# Altium PCB PCB1.PcbDoc
Units mm, origin at the board's own origin, x right, y up, seen from the top; angles counter-clockwise.
Board outline 171.96 x 108.97 mm, 2 copper layers (Top Layer, Bottom Layer); 22 components, 29 nets, 174 pads, 7 vias.
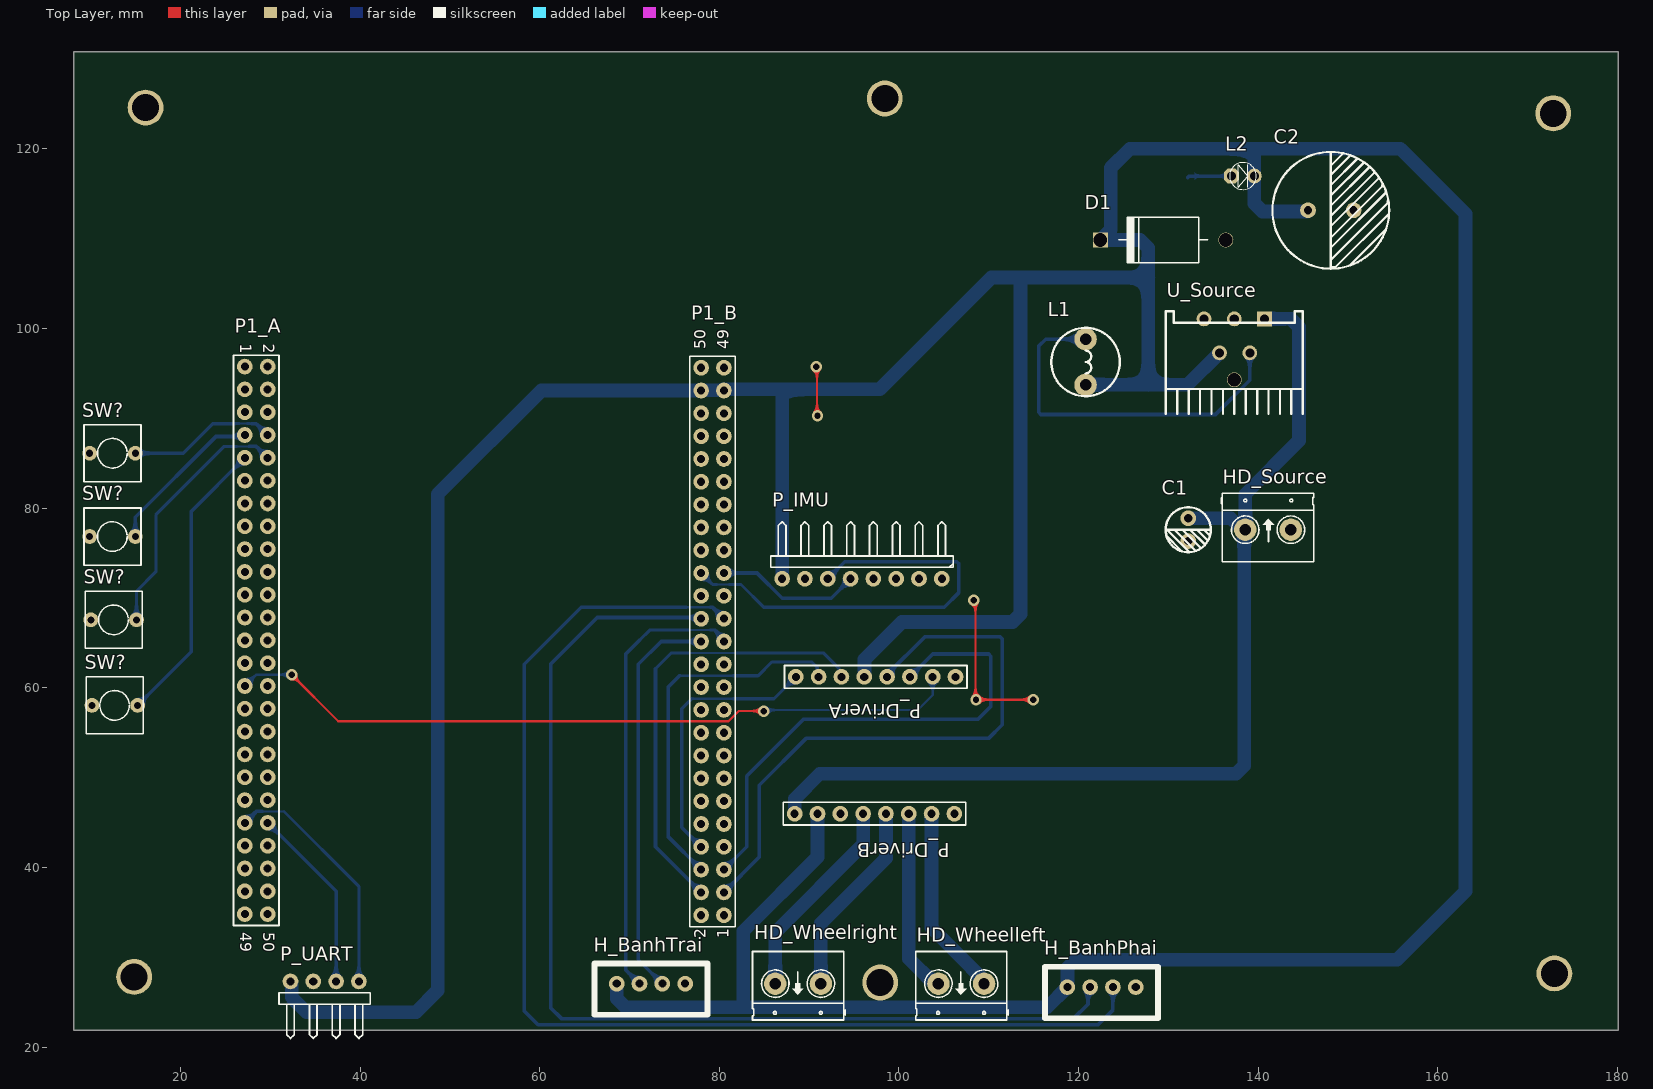
[diagram p0: Top Layer view]
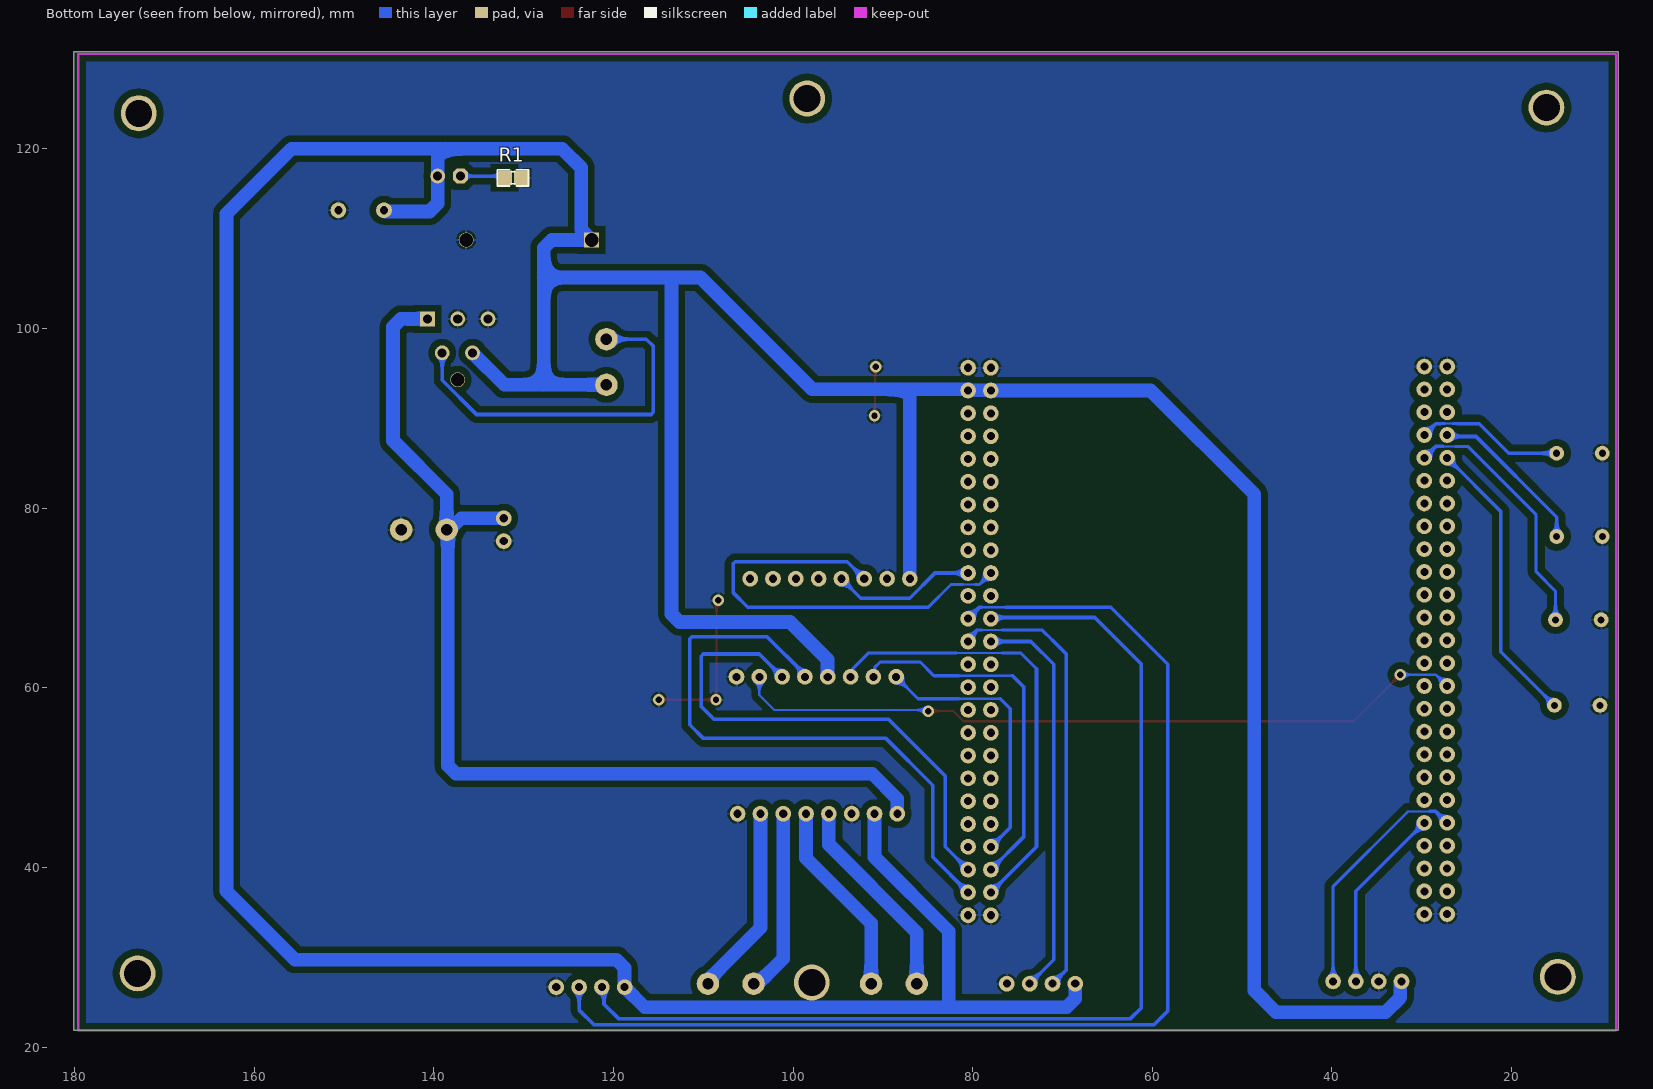
[diagram p1: Bottom Layer view, seen from below]

## Layer stack, top to bottom
Top Solder: solder mask 0.0102, Solder Resist, Dk 3.5
Top Layer: signal copper 0.0356
Dielectric 1: dielectric 0.32, FR-4, Dk 4.8
Bottom Layer: signal copper 0.0356
Bottom Solder: solder mask 0.0102, Solder Resist, Dk 3.5

## Board outline
8.128,21.844 180.086,21.844 180.086,130.81 8.128,130.81

## Design rules (kind name [scope] priority, off if disabled: settings)
Clearance [All] p1: gap=0.3 ignorepadtopadclearanceinfootprint=FALSE except(0.75: Arc-Fill Arc-Poly Arc-Region Track-Fill Track-Poly Track-Region SMDPad-Fill SMDPad-Poly SMDPad-Region THPad-Fill THPad-Poly THPad-Region Via-Fill Via-Poly Via-Region Fill-Fill Fill-Poly Fill-Region Poly-Poly Poly-Region Region-Region)
PolygonConnect [All] p1: connectstyle=Relief reliefconductorwidth=0.254 reliefentries=4 polygonreliefangle="90 Angle" airgapwidth=0.254
RoutingVias [All] p1: holewidth=0.711 width=1.27 viastyle="Through Hole" minholewidth=0.711 minwidth=1.27 maxholewidth=0.711 maxwidth=1.27
SolderMaskExpansion [All] p1: expansion=0.102 istentingtop=FALSE
Width Width_POWER [InNetClass('POWER')] p1: maxlimit=2.54 minlimit=0.254 preferedwidth=1.524 toplayer_maxwidth=0.254 toplayer_prefwidth=0.254 bottomlayer_minwidth=1.219 minimp=50.000000 maximp=50.000000 favimp=50.000000
Width Width_SIGANL [InNetClass('SIGNAL')] p2: maxlimit=0.6 minlimit=0.254 preferedwidth=0.4 toplayer_maxwidth=0.254 toplayer_prefwidth=0.254 bottomlayer_minwidth=0.35 minimp=50.000000 maximp=50.000000 favimp=50.000000
30 further rules are at their usual default settings.

## Classes and differential pairs
net class SIGNAL: NetL1_1 NetL2_1 PA8 PA9 PB4 PB5 PB6 PB7 PB8 PB9 PC0 PC1 PC2 PC3 PC6 PC7 PC8 PC9 PD8 PD9
net class POWER: 5V AO1 AO2 BO1 BO2 VDD VIN
component class Sheet1: C1 C2 D1 H_BanhPhai H_BanhTrai HD_Source HD_Wheelleft HD_Wheelright L1 L2 P1_A P1_B P_DriverA P_DriverB P_IMU P_UART R1 SW? U_Source

## Components (designator, comment, footprint, x,y, rotation, side; value= is the part's Value field where it differs from the comment)
C1 "100uF" "tu hoa 5mm" 132.207,77.597 r270 top
C2 "1000uF" "tu hoa 13mm" 148.082,113.157 r0 top
D1 "1N5822" D5A 122.428,109.855 r0 top value="Diode c?m 1N5408"
H_BanhPhai "Banh phai" XH2.54M-4 126.365,26.67 r180 top
H_BanhTrai "Banh trai" XH2.54M-4 76.2,27.051 r180 top
HD_Source "Header 2" HED2 138.557,77.597 r0 top
HD_Wheelleft "Header 2" HED2 109.474,27.051 r180 top
HD_Wheelright "Header 2" HED2 91.313,27.051 r180 top
L1 "100uH 3A" "CUON CAM 100uH3A" 120.777,96.266 r270 top
L2 "LED 3mm" LED-3MM-RED 137.033,116.967 r0 top
P1_A "Header 25X2" HDR2X25 27.178,95.758 r270 top
P1_B "Header 25X2" HDR2X25 80.518,34.671 r90 top
P_DriverA "Header 8" HDR1X8 106.299,61.214 r180 top
P_DriverB "Header 8" HDR1X8 88.392,45.974 r0 top
P_IMU "IMU" HDR1X8H 104.775,72.136 r180 top
P_UART "UART" HDR1X4H 32.258,27.305 r0 top
R1 "10R" "tro smd 0805" 131.191,116.84 r180 bottom
SW? "SW" SW2 10.16,58.039 r0 top value="SW chip 2 pin"
SW? "SW" SW2 10.033,67.564 r0 top value="SW chip 2 pin"
SW? "SW" SW2 9.906,76.835 r0 top value="SW chip 2 pin"
SW? "SW" SW2 9.906,86.106 r0 top value="SW chip 2 pin"
U_Source "LM2576T-5.0" LM2576t 137.363,96.825 r180 top

## Footprints (in the part's own frame and the unit in brackets; to place one, negate y for a bottom-side part, rotate by r counter-clockwise, add the part's x,y. Pads: shape width x height; smd on the part's side, far side on the other; paste and mask are expansions set on the pad)
"CUON CAM 100uH3A" [mm] "100uH3A"
  round 2.5 hole 1.27: 1(-2.54,0) 2(2.54,0)
  silkscreen extent -3.81,-3.81 3.81,3.81, body extent -4.35,-4.45 4.35,4.25, height 10.01
D5A [mm] "Diode 5A, W 200mil, L 550mil"
  round 1.65 hole 1.524: 1(13.97,0)
  rect 1.65x1.65 hole 1.524: 2(0,0)
  silkscreen extent 2.03,-2.54 11.94,2.54, body extent -1.32,-2.69 14.98,2.61, height 6.46
HDR1X4H [mm] "Connector; Header; 4 Position; Right Angle"
  round 1.75 hole 0.9: 1(0,0) 2(2.54,0) 3(5.08,0) 4(7.62,0)
  silkscreen extent -1.27,-6.35 8.89,-1.27, body extent -1.27,-7 8.89,1.27, height 4.33
HDR1X8 [mm] "Connector; Header; 8 Position"
  round 1.75 hole 0.9: 1(0,0) 2(2.54,0) 3(5.08,0) 4(7.62,0) 5(10.16,0) 6(12.7,0) 7(15.24,0) 8(17.78,0)
  silkscreen extent -1.27,-1.27 19.05,1.27, body extent -1.27,-1.27 19.05,1.27, height 7
HDR1X8H [mm] "Connector; Header; 8 Position; Right Angle"
  round 1.75 hole 0.9: 1(0,0) 2(2.54,0) 3(5.08,0) 4(7.62,0) 5(10.16,0) 6(12.7,0) 7(15.24,0) 8(17.78,0)
  silkscreen extent -1.27,-6.35 19.05,-1.27, body extent -1.27,-7 19.05,1.27, height 4.33
HDR2X25 [mm] "Connector; Header; 25x2 Position"
  round 1.75 hole 0.9: 1(0,0) 2(0,2.54) 3(2.54,0) 4(2.54,2.54) 5(5.08,0) 6(5.08,2.54) 7(7.62,0) 8(7.62,2.54) 9(10.16,0) 10(10.16,2.54) 11(12.7,0) 12(12.7,2.54) 13(15.24,0) 14(15.24,2.54) 15(17.78,0) 16(17.78,2.54) 17(20.32,0) 18(20.32,2.54) 19(22.86,0) 20(22.86,2.54) 21(25.4,0) 22(25.4,2.54) 23(27.94,0) 24(27.94,2.54) 25(30.48,0) 26(30.48,2.54) 27(33.02,0) 28(33.02,2.54) 29(35.56,0) 30(35.56,2.54) 31(38.1,0) 32(38.1,2.54) 33(40.64,0) 34(40.64,2.54) 35(43.18,0) 36(43.18,2.54) 37(45.72,0) 38(45.72,2.54) 39(48.26,0) 40(48.26,2.54) 41(50.8,0) 42(50.8,2.54) 43(53.34,0) 44(53.34,2.54) 45(55.88,0) 46(55.88,2.54) 47(58.42,0) 48(58.42,2.54) 49(60.96,0) 50(60.96,2.54)
  silkscreen extent -1.27,-1.27 62.23,3.81, body extent -1.27,-1.27 62.23,3.81, height 1.5
HED2 [mm] "Header 2, 2 pin, hight 300mil, Pin to Pin 200, Colour Green"
  round 2.5 hole 1.27: 1(0,0) 2(5.08,0)
  silkscreen extent -2.69,-3.58 7.62,4.04, body extent -2.49,-3.46 7.51,4.04, height 10
LED-3MM-RED [mm]
  oct 1.65x1.65 hole 1.016: 1(0,0)
  round 1.65 hole 1.016: 2(2.54,0)
  silkscreen extent -0.23,-1.5 2.77,1.5, body extent -0.69,-1.97 2.98,2.03, height 4.6
LM2576t [mil]
  rect 64.96x64.96 hole 40: 1(-132,-167.09)
  round 64.96 hole 40: 2(-67,-18) 3(1,-167) 4(66,-18) 5(134,-167)
  round 64.96 hole 59.06: ""(1,100)
  silkscreen extent -299,-200 301,250, body extent -199,-175 201,150, height 859
SW2 [mm] "SW button 2pin, 250x 250 mil"
  round 1.65 hole 0.787: 1(0,0) 2(5.08,0)
  silkscreen extent -0.64,-3.17 5.71,3.17, body extent -0.46,-2.95 5.54,3.25, height 5
"tro smd 0805" [mm]
  rect 1.65x1.65 smd: 1(-0.946,-0.061) 2(0.954,-0.061)
  silkscreen extent -1.75,-0.97 1.75,0.84, body extent -1.56,-0.76 1.44,0.64, height 0.53
"tu hoa 5mm" [mm]
  round 1.75 hole 0.9: 1(-1.27,0) 2(1.27,0)
  silkscreen extent -2.51,-2.51 2.51,2.51, body extent -3.12,-3.18 3.23,3.18, height 14.55
"tu hoa 13mm" [mm]
  round 1.75 hole 0.9: 1(-2.54,0) 2(2.54,0)
  silkscreen extent -6.5,-6.5 6.5,6.5, body extent -6.25,-6.25 6.26,6.25, height 23.02
XH2.54M-4 [mm]
  round 1.75 hole 0.9: 1(0,0) 2(2.54,0) 3(5.08,0) 4(7.62,0)
  silkscreen extent -2.48,-2.26 10.1,3.46, body extent -2.48,-2.26 10.1,3.48, height 6.91

## Part data
C1: library part "Tu Hoa 100uF 25V 6x11", "Cắm", Chung_Loai=Cắm, Don_Vi=Con, Ma_Hang=MH001351, So_Chan=2, Ten_Linh_Kien="Tụ Hóa 100uF 25V 6x11MM"
C2: library part "Tu Hoa 1000uF 25V 13x21", "Cắm", Chung_Loai=Cắm, Don_Vi=Con, Ma_Hang=MH002315, So_Chan=2, Ten_Linh_Kien="Tụ Hóa 1000uF 25V 13x21MM"
D1: "Schottky Rectifiers"
H_BanhPhai H_BanhTrai: library part "Header 4P 2.54 Duc Thang", "Cắm", Chung_Loai=Cắm, Don_Vi=Con, Ma_Hang=MH001285, Ten_Linh_Kien="Header 4P XH2.54-4P Đực Thẳng"
HD_Source HD_Wheelleft HD_Wheelright: library part Hed2, "Header 2 (Green)"
L1: library part "CUON CAM 100uH DIP", "Dán", Chung_Loai=Dán, Don_Vi=Con, Ma_Hang=MH002209, Ten_Linh_Kien="Cuộn Cảm 100uH 3A 8x10MM"
L2: library part "LED 3mm Do", "Cắm", Chung_Loai=Cắm, Don_Vi=Con, Ma_Hang=MH003892, Ten_Linh_Kien="Led 3MM Phủ Đỏ (10c)"
P1_A P1_B: "Header, 25-Pin, Dual row", LatestRevisionDate=17-Jul-2002, LatestRevisionNote="Re-released for DXP Platform.", Publisher="Altium Limited"
P_DriverA P_DriverB: "Header, 8-Pin", LatestRevisionDate=17-Jul-2002, LatestRevisionNote="Re-released for DXP Platform.", Publisher="Altium Limited"
P_IMU: library part "Header 8H", "Header, 8-Pin, Right Angle", LatestRevisionDate=17-Jul-2002, LatestRevisionNote="Re-released for DXP Platform.", Publisher="Altium Limited"
P_UART: library part "Header 4H", "Header, 4-Pin, Right Angle", LatestRevisionDate=17-Jul-2002, LatestRevisionNote="Re-released for DXP Platform.", Publisher="Altium Limited"
R1: library part "Tro 0805 1% 10R", "Dán", Chung_Loai=Dán, Don_Vi=Con, Ma_Hang=MH005474, So_Chan=2, Ten_Linh_Kien="Trở 0805 1% 10R"
SW? SW? SW? SW?: library part SW2, "Switch button 2 pin"
U_Source: "SIMPLE SWITCHER; 3A Step-Down Voltage Regulator", DigiKeyPartNumber=LM2576T-5.0-ND, Manufacturer="National Semiconductor", PackageTopMarking="NSUZXYTT*LM2576T*-5.0 P+", PowerWise=N, Code_JEDEC=TO-220-AB, ComponentLink1Description="LM2576 Datasheet", ComponentLink1URL=http://www.national.com/ds/LM/LM2576.pdf, ComponentLink2Description="LM2576 Web Page", ComponentLink2URL=http://www.national.com/pf/LM/LM2576.html, ComponentLink3Description="T05A Package Page", ComponentLink3URL=http://www.national.com/packaging/folders/t05a.html, CompType=Switcher, DatasheetVersion=Aug-2004, FirstPublished=4-Dec-2008, PackageDescription="TO-220, Molded, 5 Lead, Straight", PackageReference=T05A, PackageVersion="revJ, Jan-1992", PartNumber=LM2576T-5.0, PinCount=5, Publisher="Altium Limited", RoHS=O

## Free pads (board coordinates)
  round 4 hole 3: 2(14.859,27.813) 2(16.129,124.587) 2(97.917,27.178) 2(98.425,125.603) 2(172.847,123.952) 2(172.974,28.194)

## Via types
v1: diameter 1.27, hole 0.711, Top Layer to Bottom Layer, 7 vias

## Nets (pads, with @x,y where several pads share a name; then routed paths per layer and width w, separated by ;. In a path a pad name is that pad's centre, name@x,y a point inside that pad or via, vN(x,y) a via of type N, cw(c..) or ccw(c..) an arc to the next point about the centre after c; other vN are vias at no path point)
5V: C2.1 D1.2 H_BanhPhai.4 H_BanhTrai.4 L1.2 L2.2 P1_B.47 P1_B.48 P_DriverA.5 P_DriverB.2 P_IMU.8 P_UART.1 U_Source.4 | length 548.8
  Bottom Layer w1.524: P_UART.1@32.385,27.051 32.385,25.527 34.036,23.876 46.228,23.876 48.641,26.289 48.641,81.534 60.198,93.091 P1_B.48 ; H_BanhTrai.4 68.58,25.4 69.547,24.433 82.677,24.433 ; P1_B.48@77.978,93.125 P1_B.47@80.484,93.125 ; P1_B.47@80.391,93.218 87.63,93.218 ; P_IMU.8 86.995,92.583 87.63,93.218 ; P_DriverB.2 90.932,41.148 82.677,32.893 82.677,24.433 ; P_DriverA.5 96.163,61.238 96.163,63.143 100.33,67.31 112.645,67.31 113.538,68.203 113.538,104.902 ; L1.2 127.762,93.726 ; D1.2 126.869,109.855 127.762,108.962 127.762,105.664 ; D1.2@122.555,109.982 123.571,110.998 123.571,117.856 125.73,120.015 138.68,120.015 ; U_Source.4 132.131,93.726 127.762,93.726 ; C2.1@145.63,113.069 145.454,113.069 145.415,113.03 140.466,113.03 139.573,113.923 L2.2 139.573,119.122 138.68,120.015 ; 82.677,24.433 116.508,24.433 118.721,26.646 118.721,26.67 118.769,26.718 118.769,28.825 119.662,29.718 155.448,29.718 163.068,37.338 163.068,112.776 155.829,120.015 138.68,120.015 ; 87.63,93.218 97.854,93.218 110.3,105.664 127.762,105.664 ; 127.762,93.726 127.762,105.664
AO1: HD_Wheelright.2 P_DriverB.4 | length 23
  Bottom Layer w1.524: HD_Wheelright.2 86.233,32.766 96.012,42.545 P_DriverB.4
AO2: HD_Wheelright.1 P_DriverB.5 | length 21.9
  Bottom Layer w1.524: HD_Wheelright.1 91.313,33.782 98.552,41.021 P_DriverB.5
BO1: HD_Wheelleft.1 P_DriverB.7 | length 21.3
  Bottom Layer w1.524: P_DriverB.7 103.632,33.274 109.45,27.456 109.45,27.075 HD_Wheelleft.1
BO2: HD_Wheelleft.2 P_DriverB.6 | length 20.6
  Bottom Layer w1.524: P_DriverB.6 101.092,29.845 HD_Wheelleft.2@104.267,26.67
GND: C1.2 C2.2 D1.1 H_BanhPhai.1 H_BanhTrai.1 HD_Source.2 P1_A.1 P1_A.2 P1_A.49 P1_A.50 P1_B.1 P1_B.2 P1_B.49 P1_B.50 P_DriverA.1 P_DriverB.3 P_DriverB.8 P_IMU.7 P_UART.2 R1.2 SW?.1 U_Source.3 U_Source.5 | length 22.9
  Top Layer w0.254: v1(90.932,90.297) 90.868,90.361 90.868,95.567 v1@90.932,95.631 ; v1(108.331,69.723) 108.525,69.529 108.525,58.734 v1(108.585,58.674) v1(114.935,58.674)
  other v1: 90.805,95.758
NetL1_1: L1.1 U_Source.2 | length 41.1
  Bottom Layer w0.4: L1.1 116.332,98.806 115.57,98.044 115.57,90.658 115.804,90.424 135.245,90.424 139.065,94.244 U_Source.2
NetL2_1: L2.1 R1.1 | length 5
  Bottom Layer w0.4: R1.1 132.324,116.967 136.906,116.967 L2.1@137.033,116.84
PA8: P1_B.8 P_DriverA.8 | length 30.4
  Bottom Layer w0.254: 76.941,58.78 77.889,58.78 cw(c77.978,57.531) 77.978,58.783 80.518,58.783 cw(c80.518,57.531) 80.607,58.78 81.513,58.78
  Bottom Layer w0.35: 81.513,58.78 86.085,58.78 P_DriverA.8
  Bottom Layer w0.4: 76.941,58.78 75.819,57.658 75.819,44.45 P1_B.8
PA9: P1_B.7
PB4: H_BanhTrai.2 P1_B.26 | length 44.4
  Bottom Layer w0.4: H_BanhTrai.2 70.993,29.718 70.993,62.611 73.533,65.151 P1_B.26@77.724,65.151
PB5: H_BanhTrai.3 P1_B.25 | length 50
  Bottom Layer w0.254: 76.708,66.421 79.502,66.421
  Bottom Layer w0.35: 71.12,65.278 72.263,66.421 76.708,66.421
  Bottom Layer w0.4: H_BanhTrai.3 69.596,28.575 69.596,63.754 71.12,65.278 ; 79.502,66.421 80.518,65.405 P1_B.25
PB6: H_BanhPhai.3 P1_B.28 | length 120.4
  Bottom Layer w0.4: P1_B.28@78.232,67.818 66.421,67.818 61.214,62.611 61.214,24.384 62.427,23.171 119.437,23.171 121.046,24.78 121.046,26.431 H_BanhPhai.3
PB7: H_BanhPhai.2 P1_B.27 | length 133.3
  Bottom Layer w0.254: 76.327,68.961 78.867,68.961
  Bottom Layer w0.35: 75.057,68.961 76.327,68.961
  Bottom Layer w0.4: 75.057,68.961 64.643,68.961 58.293,62.611 58.293,24.003 59.825,22.471 122.166,22.471 123.825,24.13 H_BanhPhai.2 ; 78.994,68.961 79.248,68.961 P1_B.27
PB8: P1_B.32 P_IMU.6 | length 49.4
  Bottom Layer w0.254: 79.756,71.501 81.082,71.501
  Bottom Layer w0.35: P1_B.32@77.978,72.644 78.105,72.644 79.248,71.501 79.756,71.501 ; 81.082,71.501 82.423,71.501 84.963,68.961
  Bottom Layer w0.4: 84.963,68.961 105.029,68.961 106.68,70.612 106.68,73.807 106.446,74.041 93.98,74.041 92.456,72.517 P_IMU.6@92.075,72.517
PB9: P1_B.31 P_IMU.5 | length 16.5
  Bottom Layer w0.4: P1_B.31 84.201,72.771 86.995,69.977 92.456,69.977 P_IMU.5 94.742,72.263 P_IMU.5@94.869,72.263
PC0: P1_A.8 SW?.2@14.986,86.106 | length 16.6
  Bottom Layer w0.254: 26.035,89.408 27.94,89.408
  Bottom Layer w0.4: SW?.2@14.986,86.106 20.32,86.106 23.622,89.408 26.035,89.408 ; 27.94,89.408 28.448,89.408 P1_A.8
PC1: P1_A.7 SW?.2@14.986,76.835 | length 18.1
  Bottom Layer w0.4: SW?.2@14.986,76.835 14.986,78.994 23.967,87.975 27.015,87.975 P1_A.7
PC2: P1_A.10 SW?.2@15.113,67.564 | length 28.6
  Bottom Layer w0.254: 26.289,86.868 27.559,86.868
  Bottom Layer w0.35: SW?.2@15.113,67.564 15.113,70.76 17.272,72.919 17.272,79.248 24.892,86.868 26.289,86.868
  Bottom Layer w0.4: 27.686,86.868 28.448,86.868 P1_A.10
PC3: P1_A.9 SW?.2@15.24,58.039 | length 32.5
  Bottom Layer w0.4: SW?.2@15.24,58.039 21.209,64.008 21.209,79.629 P1_A.9
PC6: P1_B.4 P_DriverA.6 | length 49.9
  Bottom Layer w0.254: 76.708,63.881 81.788,63.881
  Bottom Layer w0.35: 72.898,62.103 74.676,63.881 76.708,63.881 ; 81.788,63.881 91.567,63.881 93.35,62.098 93.35,61.463 P_DriverA.6
  Bottom Layer w0.4: 72.898,62.103 72.898,42.291 P1_B.4
PC7: P1_B.3 P_DriverA.4 | length 67.9
  Bottom Layer w0.4: P1_B.3 84.455,41.148 84.455,49.149 89.662,54.356 109.982,54.356 111.506,55.88 111.506,65.425 111.272,65.659 102.87,65.659 98.679,61.468 P_DriverA.4
PC8: P1_B.6 P_DriverA.7 | length 41
  Bottom Layer w0.254: 75.565,61.341 81.534,61.341
  Bottom Layer w0.35: 81.534,61.341 84.328,61.341 85.852,62.865 90.297,62.865 90.899,62.263 90.899,61.374 P_DriverA.7
  Bottom Layer w0.4: 75.565,61.341 74.295,60.071 74.295,43.434 P1_B.6
PC9: P1_B.5 P_DriverA.3 | length 57.7
  Bottom Layer w0.4: P1_B.5 83.058,42.291 83.058,50.165 89.408,56.515 108.839,56.515 110.236,57.912 110.236,63.52 110.002,63.754 103.759,63.754 101.6,61.595 P_DriverA.3@100.965,61.595
PD8: P1_A.42 P_UART.3 | length 21.2
  Bottom Layer w0.4: P1_A.42@29.718,45.339 P1_A.42 37.338,37.338 P_UART.3
PD9: P1_A.41 P_UART.4 | length 27.3
  Bottom Layer w0.254: 29.253,46.228 31.539,46.228
  Bottom Layer w0.35: 31.539,46.228 39.878,37.889 P_UART.4 P_UART.4@39.751,27.178
  Bottom Layer w0.4: P1_A.41 28.448,46.228 29.114,46.228
PE11: P1_A.29 P_DriverA.2 | length 82.4
  Top Layer w0.254: v1(32.385,61.468) 37.574,56.279 81.037,56.279 82.162,57.404 v1(84.963,57.404)
  Bottom Layer w0.254: P1_A.29 28.43,61.45 32.113,61.45 32.131,61.468 v1@32.258,61.468 ; v1(84.963,57.404) 85.09,57.531 102.108,57.531 103.759,59.182 P_DriverA.2
VDD: P1_B.29
VIN: C1.1 HD_Source.1 P_DriverB.1 U_Source.1 | length 115.3
  Bottom Layer w1.524: P_DriverB.1 88.392,47.625 91.186,50.419 137.537,50.419 138.43,51.312 138.43,77.597 138.213,77.597 136.943,78.867 C1.1 ; HD_Source.1@138.557,77.851 138.557,81.534 144.549,87.526 144.549,100.176 143.656,101.069 U_Source.1
pads on no net: P1_A.3 P1_A.4 P1_A.5 P1_A.6 P1_A.11 P1_A.12 P1_A.13 P1_A.14 P1_A.15 P1_A.16 P1_A.17 P1_A.18 P1_A.19 P1_A.20 P1_A.21 P1_A.22 P1_A.23 P1_A.24 P1_A.25 P1_A.26 P1_A.27 P1_A.28 P1_A.30 P1_A.31 P1_A.32 P1_A.33 P1_A.34 P1_A.35 P1_A.36 P1_A.37 P1_A.38 P1_A.39 P1_A.40 P1_A.43 P1_A.44 P1_A.45 P1_A.46 P1_A.47 P1_A.48 P1_B.9 P1_B.10 P1_B.11 P1_B.12 P1_B.13 P1_B.14 P1_B.15 P1_B.16 P1_B.17 P1_B.18 P1_B.19 P1_B.20 P1_B.21 P1_B.22 P1_B.23 P1_B.24 P1_B.30 P1_B.33 P1_B.34 P1_B.35 P1_B.36 P1_B.37 P1_B.38 P1_B.39 P1_B.40 P1_B.41 P1_B.42 P1_B.43 P1_B.44 P1_B.45 P1_B.46 P_IMU.1 P_IMU.2 P_IMU.3 P_IMU.4 U_Source.

## Polygon pours and split planes (outlines as drawn)
GND on Bottom Layer "GND_L02_P000" (solid, remove dead copper, pour order 0): 8.128,130.81 180.086,130.81 180.086,21.971 179.959,21.844 8.128,21.844

## Keep-outs
Bottom Layer:
  lines w0.254: 8.382,21.844 8.382,130.556 179.578,130.556 179.578,21.844 8.382,21.844

## Text inside footprints (layer, text, board x,y; h text height)
P1_A: Top Overlay "2" at 29.21,98.298 h1.27 r270; Top Overlay "1" at 26.67,98.298 h1.27 r270; Top Overlay "49" at 26.67,32.766 h1.27 r270; Top Overlay "50" at 29.21,32.766 h1.27 r270
P1_B: Top Overlay "50" at 78.486,97.663 h1.27 r90; Top Overlay "49" at 81.026,97.663 h1.27 r90; Top Overlay "1" at 81.026,32.131 h1.27 r90; Top Overlay "2" at 78.486,32.131 h1.27 r90